# Altium PCB PCB_Flex_6.PcbDoc
Units mil, origin at the board's own origin, x right, y up, seen from the top; angles counter-clockwise.
Board outline 787.4 x 137.8 mil, 2 copper layers (Top Layer, Bottom Layer), stack 3.556 mil thick; 2 components, 6 nets, 12 pads, 0 vias.
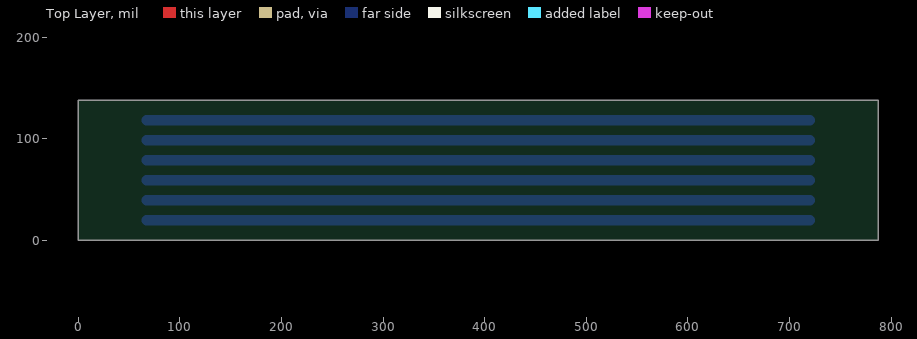
[diagram p0: Top Layer view]
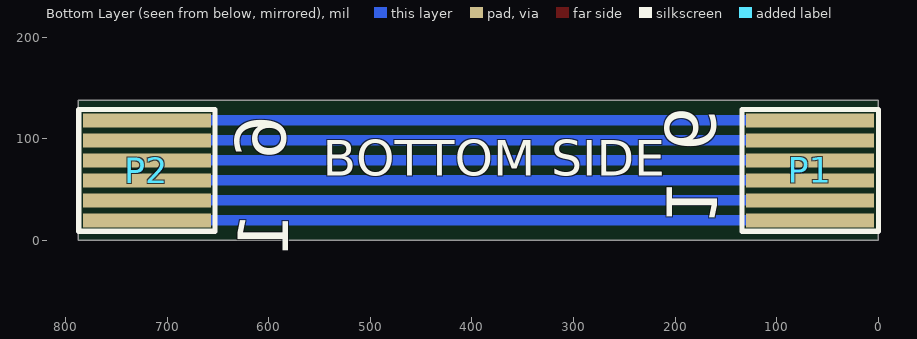
[diagram p1: Bottom Layer view, seen from below]

## Layer stack, top to bottom
Top Solder: solder mask 0.5, Solder Resist, Dk 3.5
Top Layer: signal copper 1.378
Dielectric 1: core 0.8, Polymide, Dk 4.8
Bottom Layer: signal copper 1.378
Bottom Solder: solder mask 0.5, Solder Resist, Dk 3.5

## Board outline
0,0.2 0,138 787.4,138 787.4,0.2

## Design rules (kind name [scope] priority, off if disabled: settings)
Clearance [All] p1: gap=5 ignorepadtopadclearanceinfootprint=FALSE
PolygonConnect [All] p1: connectstyle=Relief reliefconductorwidth=10 reliefentries=4 polygonreliefangle="90 Angle" airgapwidth=10
RoutingVias [All] p1: holewidth=28 width=50 viastyle="Through Hole" minholewidth=28 minwidth=50 maxholewidth=28 maxwidth=50
SolderMaskExpansion [All] p1: expansion=4 istentingtop=FALSE
Width [All] p1: maxlimit=10 minlimit=6 preferedwidth=8
30 further rules are at their usual default settings.

## Components (designator, comment, footprint, x,y, rotation, side; value= is the part's Value field where it differs from the comment)
P1 "6 Pin SMD PAD(3.2MM)" "6 Pin SMD PAD(3.2mm)" 67,68.84 r90 bottom locked
P2 "6 Pin SMD PAD(3.2MM)" "6 Pin SMD PAD(3.2mm)" 720,68.84 r90 bottom locked

## Footprints (in the part's own frame and the unit in brackets; to place one, negate y for a bottom-side part, rotate by r counter-clockwise, add the part's x,y. Pads: shape width x height; smd on the part's side, far side on the other; paste and mask are expansions set on the pad)
"6 Pin SMD PAD(3.2mm)" [mm]
  rect 0.35x3.2 smd: 1(-1.25,0) 2(-0.75,0) 3(-0.25,0) 4(0.25,0) 5(0.75,0) 6(1.25,0)
  silkscreen extent -1.52,-1.7 1.52,1.7

## Part data
P1 P2: "Ribbon Wire Connecting PADs, Length 5mm."

## Nets (pads, with @x,y where several pads share a name; then routed paths per layer and width w, separated by ;. In a path a pad name is that pad's centre, name@x,y a point inside that pad or via, vN(x,y) a via of type N, cw(c..) or ccw(c..) an arc to the next point about the centre after c; other vN are vias at no path point)
GND: P1.6 P2.6 | length 653
  Bottom Layer w10: P1.6 P2.6
OLED_RST#: P1.5 P2.5 | length 653
  Bottom Layer w10: P1.5 P2.5
SCL: P1.4 P2.4 | length 653
  Bottom Layer w10: P1.4 P2.4
SDA: P1.3 P2.3 | length 653
  Bottom Layer w10: P1.3 P2.3
VCC_3V3: P1.2 P2.2 | length 653
  Bottom Layer w10: P1.2 P2.2
VDD: P1.1 P2.1 | length 653
  Bottom Layer w10: P1.1 P2.1

## Silkscreen, mask and mechanical layers (free items; w line width, h text height)
Bottom Overlay:
  text "6" at 583,123 h50 r270
  text "6" at 209.73,87.54 h50 r90
  text "BOTTOM SIDE" at 546.91,51.53 h60
  text "1" at 581,27 h50 r270
  text "1" at 208,15 h50 r90
Mechanical 2:
  the board outline again, w5

## Dimensions
0,138 to 0,0.2 on Mechanical 1
0,138 to 787.4,138 on Mechanical 1